# Altium PCB DfPlayer_board.PcbDoc
Units mm, origin at the board's own origin, x right, y up, seen from the top; angles counter-clockwise.
Board outline 50 x 50 mm, 2 copper layers (Top Layer, Bottom Layer); 4 components, 6 nets, 25 pads, 0 vias.
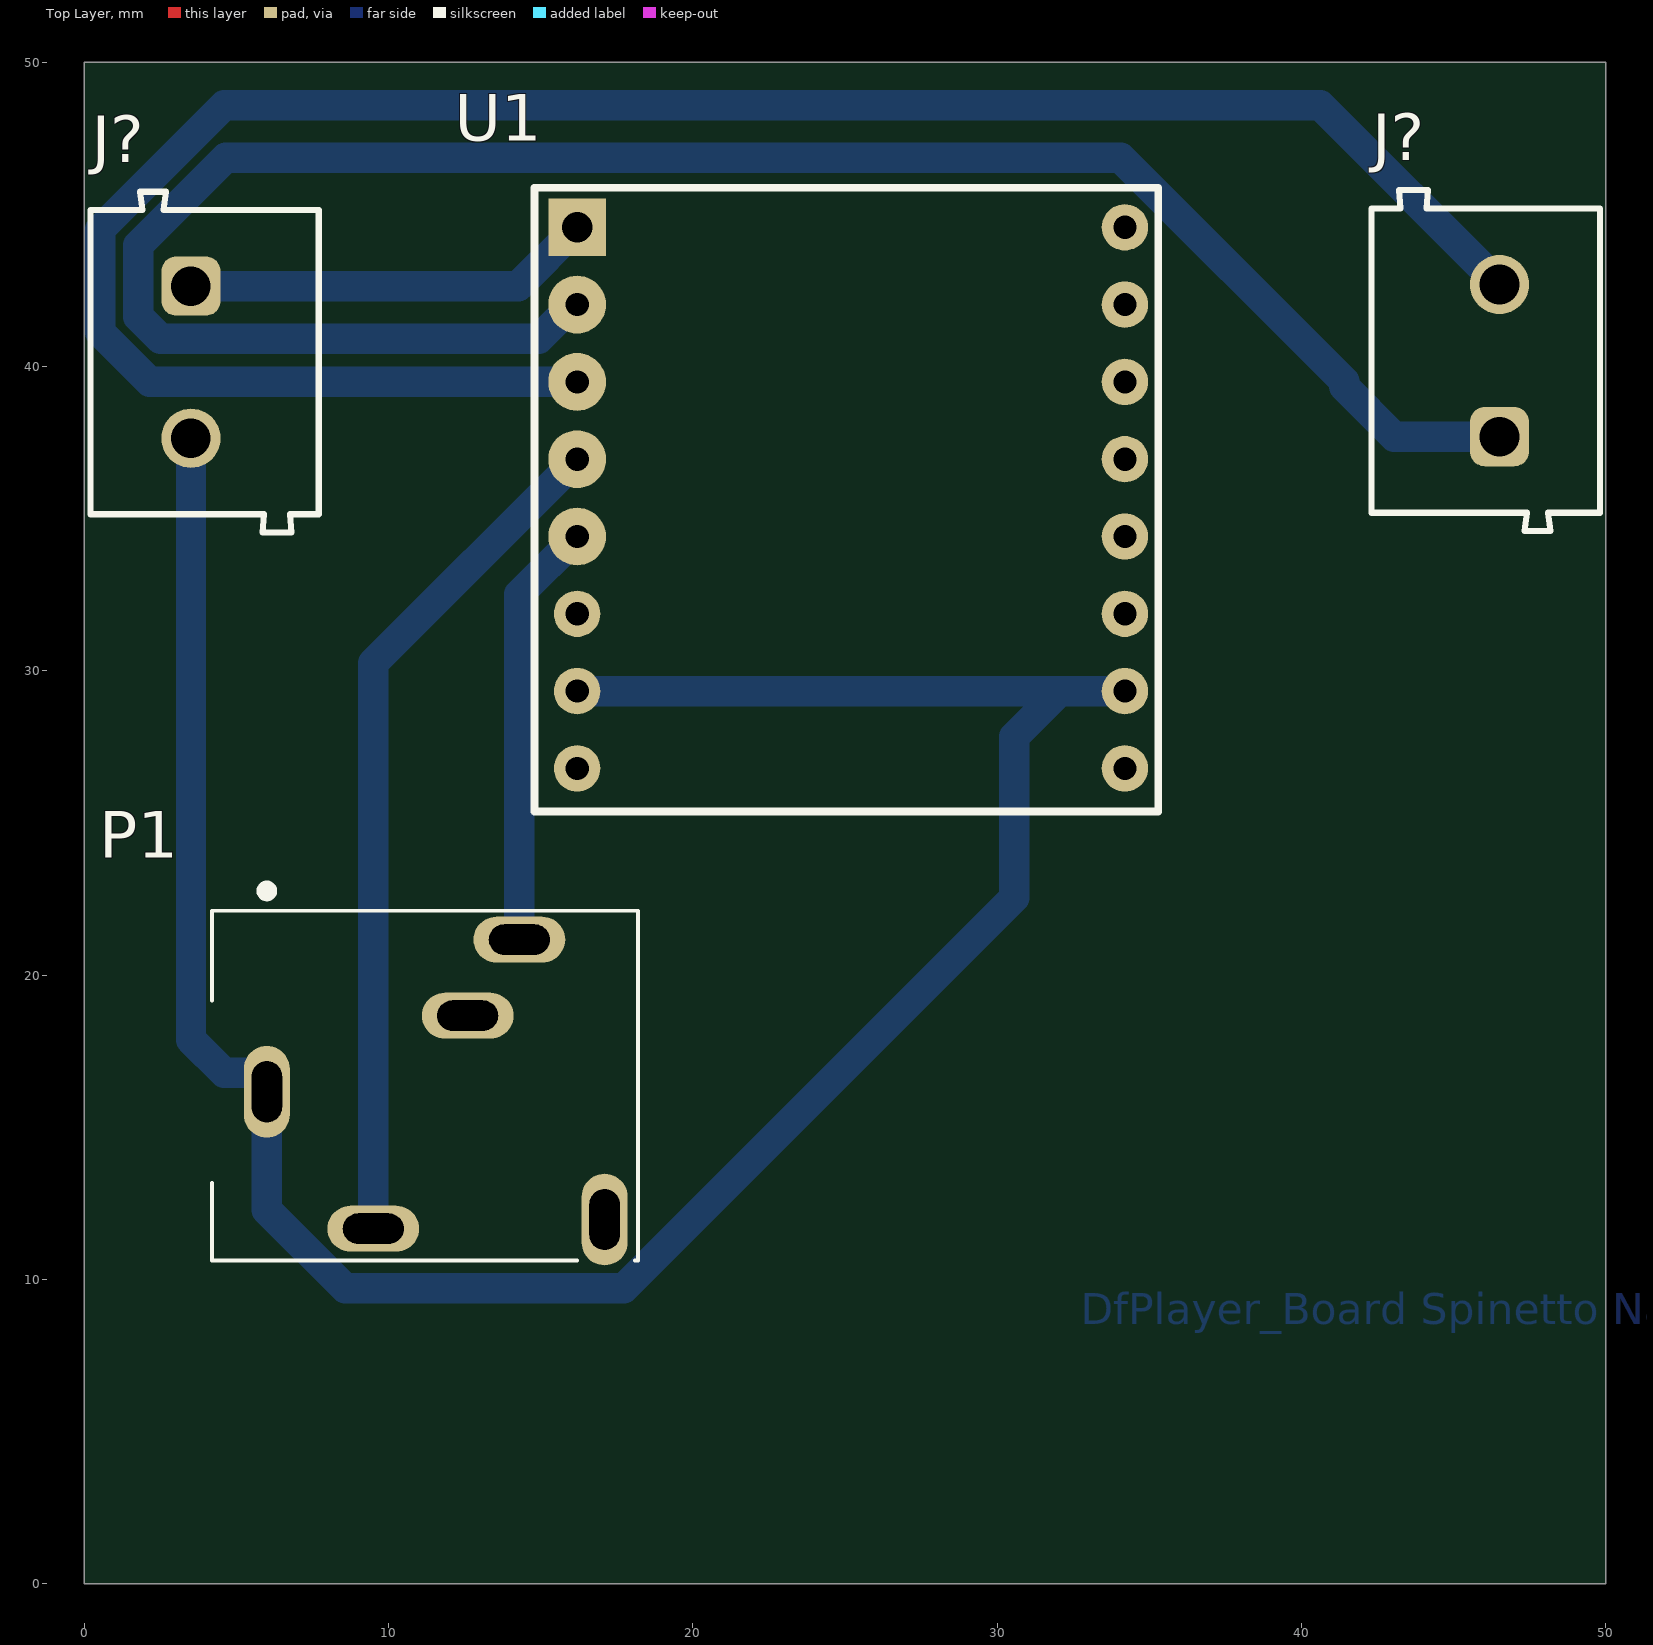
[diagram p0: Top Layer view]
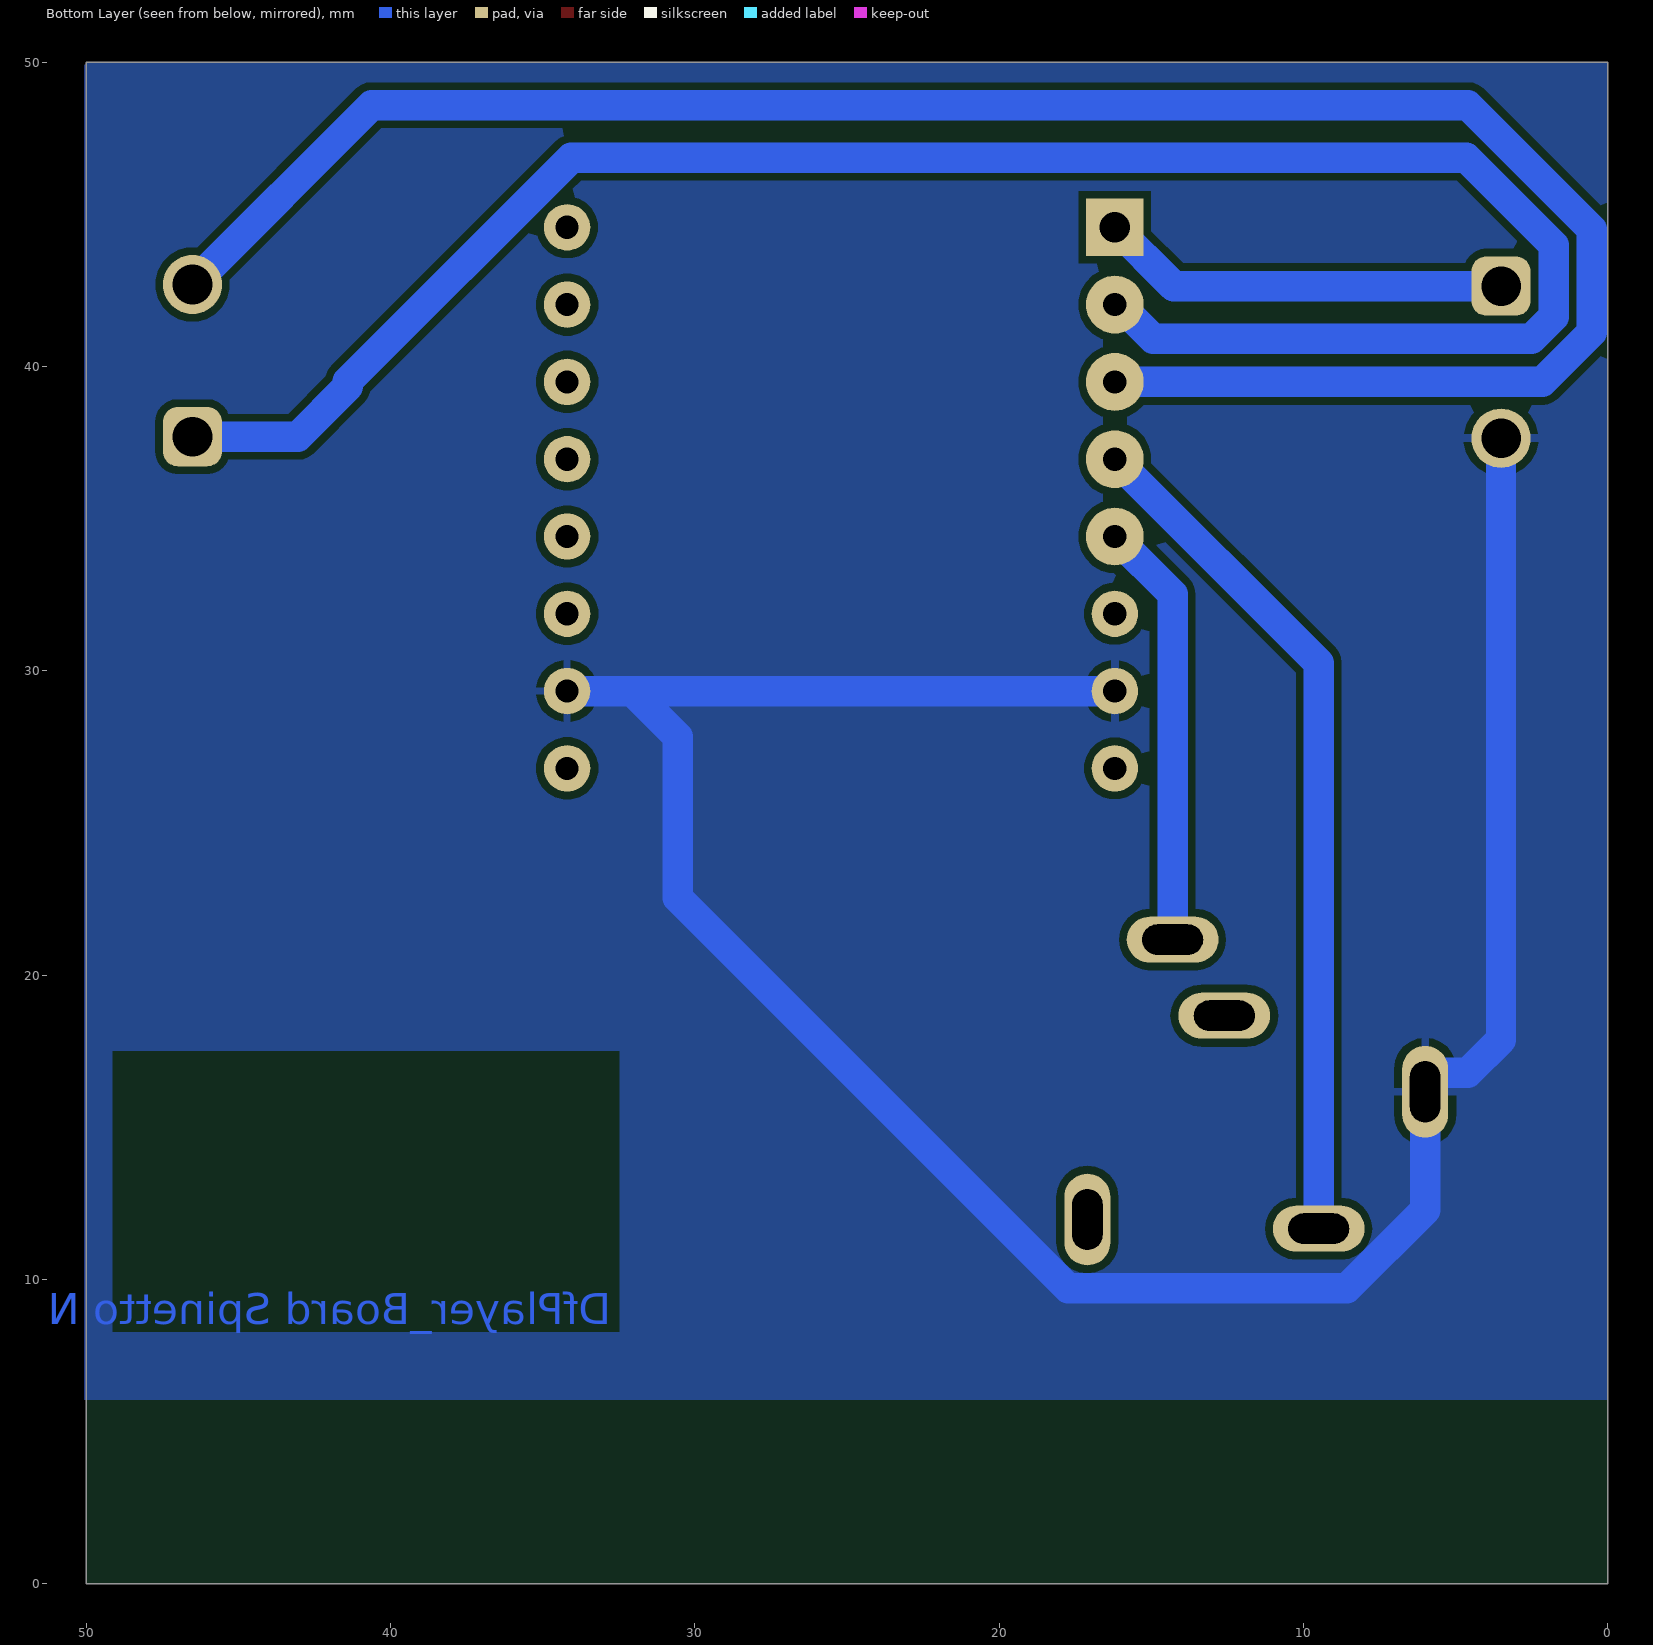
[diagram p1: Bottom Layer view, seen from below]
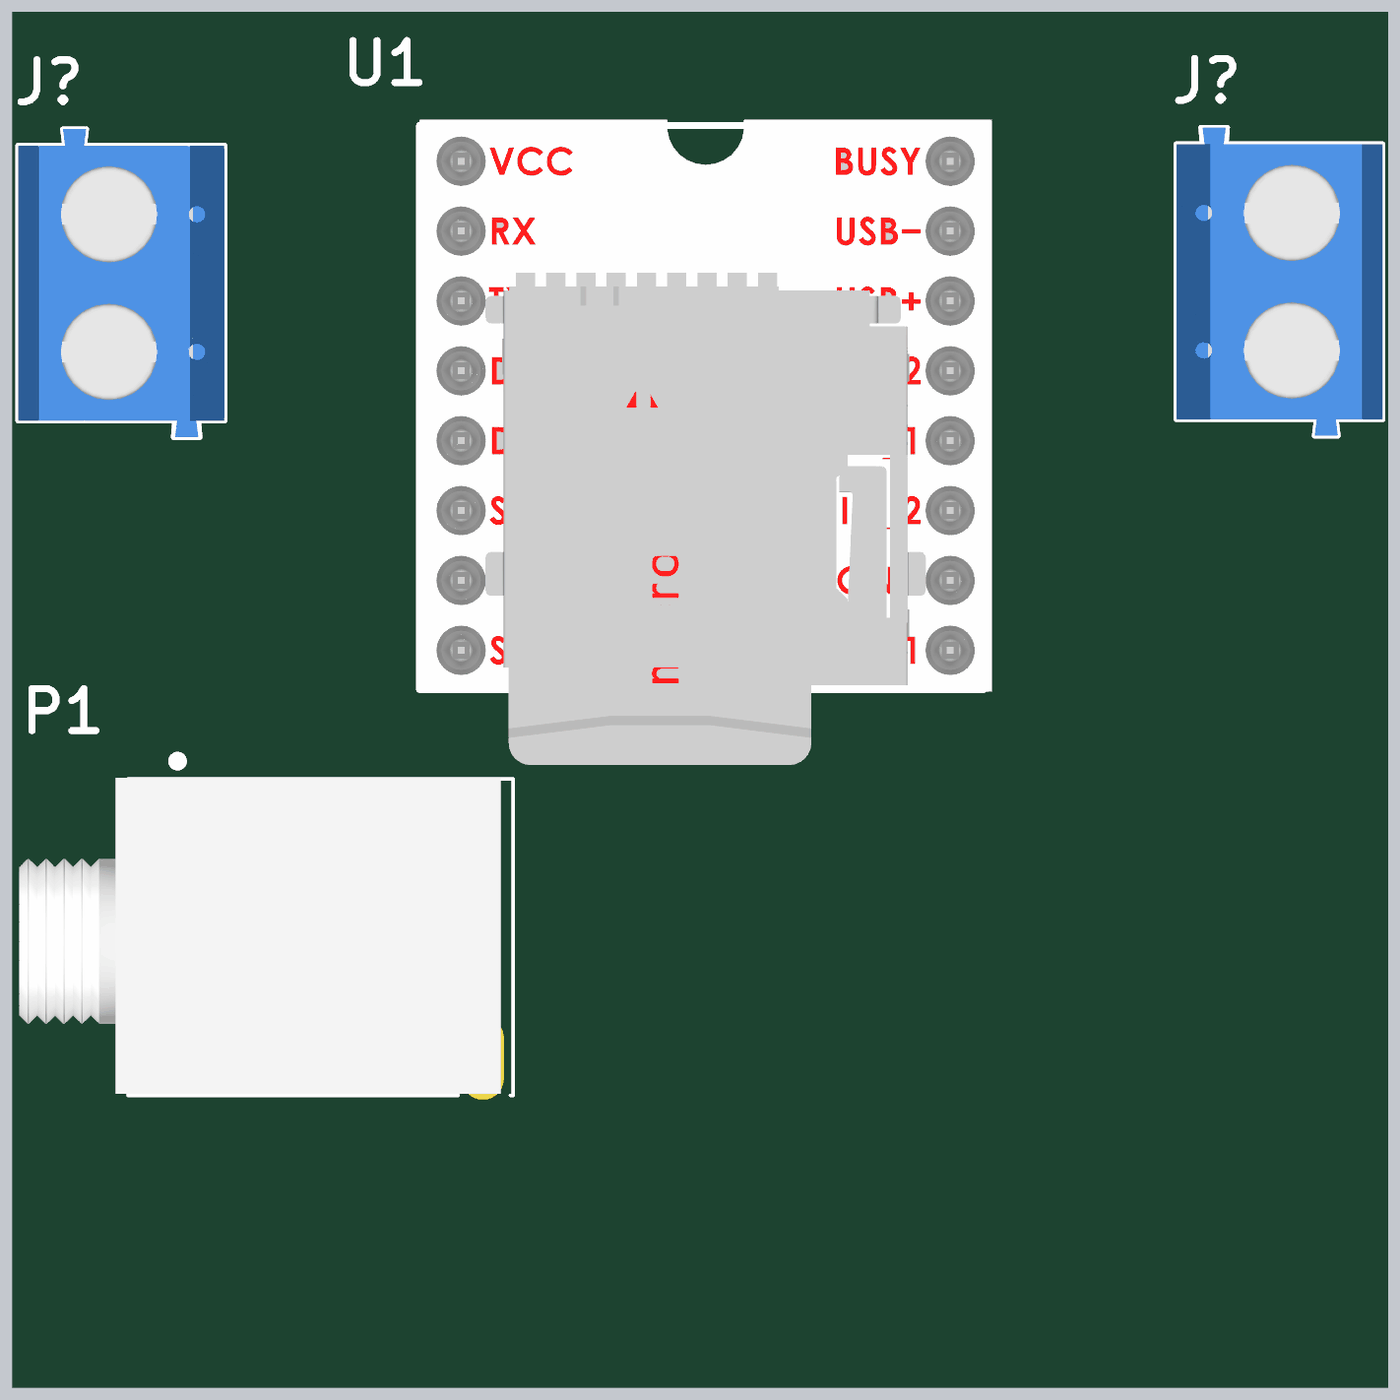
[diagram p2: 3D render of the assembled board from above, using the file's embedded part models]

## Layer stack, top to bottom
Top Solder: solder mask 0.0102, Solder Resist, Dk 3.5
Top Layer: signal copper 0.0356
Dielectric 1: dielectric 0.32, FR-4, Dk 4.8
Bottom Layer: signal copper 0.0356
Bottom Solder: solder mask 0.0102, Solder Resist, Dk 3.5

## Board outline
0,0 50,0 50,50 0,50

## Design rules (kind name [scope] priority, off if disabled: settings)
Clearance [All] p1: gap=0.254 ignorepadtopadclearanceinfootprint=FALSE
PolygonConnect [All] p1: connectstyle=Relief reliefconductorwidth=0.254 reliefentries=4 polygonreliefangle="90 Angle" airgapwidth=0.254
RoutingVias [All] p1: holewidth=0.711 width=1.27 viastyle="Through Hole" minholewidth=0.711 minwidth=1.27 maxholewidth=0.711 maxwidth=1.27
SolderMaskExpansion [All] p1: expansion=0 istentingtop=FALSE
Width [All] p1: maxlimit=1 minlimit=0.254 preferedwidth=0.254
30 further rules are at their usual default settings.

## Classes and differential pairs
component class DfPlayer_board: J? P1 U1

## Components (designator, comment, footprint, x,y, rotation, side; value= is the part's Value field where it differs from the comment)
J? "691102710002" 691102710002#1 3.955,40.147 r270 top (schematic designator J2)
J? "691102710002" 691102710002#2 46.057,40.197 r90 top (schematic designator J1)
P1 "Jack_Stereo_3.5mm" CUI_SJ1-3515 5.998,16.169 r0 top
U1 "DfPlayer" DFPLAYER_MINI_MP3 25.197,35.687 r0 top

## Footprints (in the part's own frame and the unit in brackets; to place one, negate y for a bottom-side part, rotate by r counter-clockwise, add the part's x,y. Pads: shape width x height; smd on the part's side, far side on the other; paste and mask are expansions set on the pad)
691102710002#1 [mm] "5,00mm - modular - blue - Horizontal entry with pressure clamp - 9,9 mm height - 02p"
  rrect50% 1.95x1.95 hole 1.3 unplated: 1(-2.5,-0.45)
  round 1.95 hole 1.3: 2(2.5,-0.45)
  silkscreen extent -5.6,-3.75 5.6,3.75, body extent -5.6,-3.75 5.6,3.75, height 9.96
691102710002#2 [mm] "5,00mm - modular - blue - Horizontal entry with pressure clamp - 9,9 mm height - 02p"
  rrect50% 1.95x1.95 hole 1.3: 1(-2.5,-0.45)
  round 1.95 hole 1.3: 2(2.5,-0.45)
  silkscreen extent -5.6,-3.75 5.6,3.75, body extent -5.6,-3.75 5.6,3.75, height 9.96
CUI_SJ1-3515 [mm]
  oval 1.508x3.016 hole 1 slot 2 at 90 deg: 1(0,0) 4(11.1,-4.2)
  oval 3.016x1.508 hole 1 slot 2 at 0 deg: 2(3.5,-4.5) 3(8.3,5) 5(6.6,2.5)
  silkscreen extent -1.8,-5.55 12.2,6.77, body extent -5.75,-5.5 11.75,6, height 5.87
DFPLAYER_MINI_MP3 [mil] "HEADER for DfPlayer mini MP3"
  rect 74.8x74.8 hole 39.37: 1(-354.33,350)
  round 74.8 hole 30: 2(-354.33,250) 3(-354.33,150) 4(-354.33,50) 5(-354.33,-50)
  round 60 hole 30: 6(-354.33,-150) 7(-354.33,-250) 8(-354.33,-350) 9(354.33,-350) 10(354.33,-250) 11(354.33,-150) 12(354.33,-50) 13(354.33,50) 14(354.33,150) 14(354.33,250) 16(354.33,350)
  silkscreen extent -409,-406 398,401, body extent -409,-514 409,409, height 315

## Part data
J? J?: library part CMP-1502-03258-3, "102 Series 5MM Pitch Straight, Pcb Terminal Block, Through Hole, 2 Way", Color=Blue, Current=15A, Max Operating Temperature=105°C, Min Operating Temperature=-40°C, Voltage=300V, Contact Material=Brass, Contact Plating=Tin, Current Rating=15A, Height=13.4mm, Housing Material=Nylon, Lead Pitch=5mm, Length=7.5mm, Mount="Through Hole", Number of Contacts=2, Number of Levels=1, Number of Pins=2, Number of Positions Per Level=2, Packaging=Box, Pitch=5.0038mm, Plating=Steel, RoHS=Compliant, Stripping Length=-6mm, Termination=Screw, Voltage Rating=300V, Width=11.2mm, Wire Gauge (Max)=22AWG, Wire Gauge (Min)=14AWG, Wire/Cable Gauge=22AWG
P1: "Conector Jack stereo 3.5mm sin microfono"
U1: "Header for DfPlayer mini MP3 2x8 pins"

## Nets (pads, with @x,y where several pads share a name; then routed paths per layer and width w, separated by ;. In a path a pad name is that pad's centre, name@x,y a point inside that pad or via, vN(x,y) a via of type N, cw(c..) or ccw(c..) an arc to the next point about the centre after c; other vN are vias at no path point)
"Audio Left": P1.3 U1.5 | length 14
  Bottom Layer w1: P1.3 14.298,32.519 U1.5
"Audio Right": P1.2 U1.4 | length 28.1
  Bottom Layer w1: P1.2 9.498,30.259 U1.4
GND: J?.2@3.505,37.647 P1.1 U1.7 U1.10 | length 83.3
  Bottom Layer w1: J?.2@3.505,37.647 3.505,17.882 4.597,16.789 5.764,16.789 5.998,16.555 P1.1 5.998,12.282 8.574,9.707 17.723,9.707 30.556,22.54 30.556,27.838 31.955,29.237 ; U1.7 U1.10
Rx: J?.1@46.507,37.697 U1.2 | length 67.3
  Bottom Layer w1: U1.2 16.055,42.037 14.936,40.918 2.503,40.918 1.776,41.645 1.776,43.991 4.648,46.863 34.055,46.863 41.402,39.516 41.402,39.346 43.051,37.697 J?.1@46.507,37.697
Tx: J?.2@46.507,42.697 U1.3 | length 69.9
  Bottom Layer w1: U1.3 2.151,39.497 0.522,41.125 0.522,44.51 4.602,48.59 40.615,48.59 J?.2@46.507,42.697
VCC: J?.1@3.505,42.647 U1.1 | length 13.5
  Bottom Layer w1: J?.1@3.505,42.647 14.266,42.647 U1.1
pads on no net: P1.4 P1.5 U1.6 U1.8 U1.9 U1.11 U1.12 U1.13 U1.14 U1.16

## Polygon pours and split planes (outlines as drawn)
GND on Bottom Layer "GND_Bottom" (solid, remove dead copper, pour order 0): 49.987,49.987 0,49.987 0,6.045 50.063,6.045 50.063,49.911 49.987,49.987 49.962,50.013

## Other copper
Bottom Layer:
  text "DfPlayer_Board Spinetto Nahuel    Vecchi Tomas Amboage Lucas" at 32.741,8.534 h1.02